# Altium PCB PCB1.PcbDoc
Units mm, origin at the board's own origin, x right, y up, seen from the top; angles counter-clockwise.
Board outline 164.72 x 160.53 mm, 2 copper layers (Top Layer, Bottom Layer); 88 components, 81 nets, 254 pads, 0 vias.
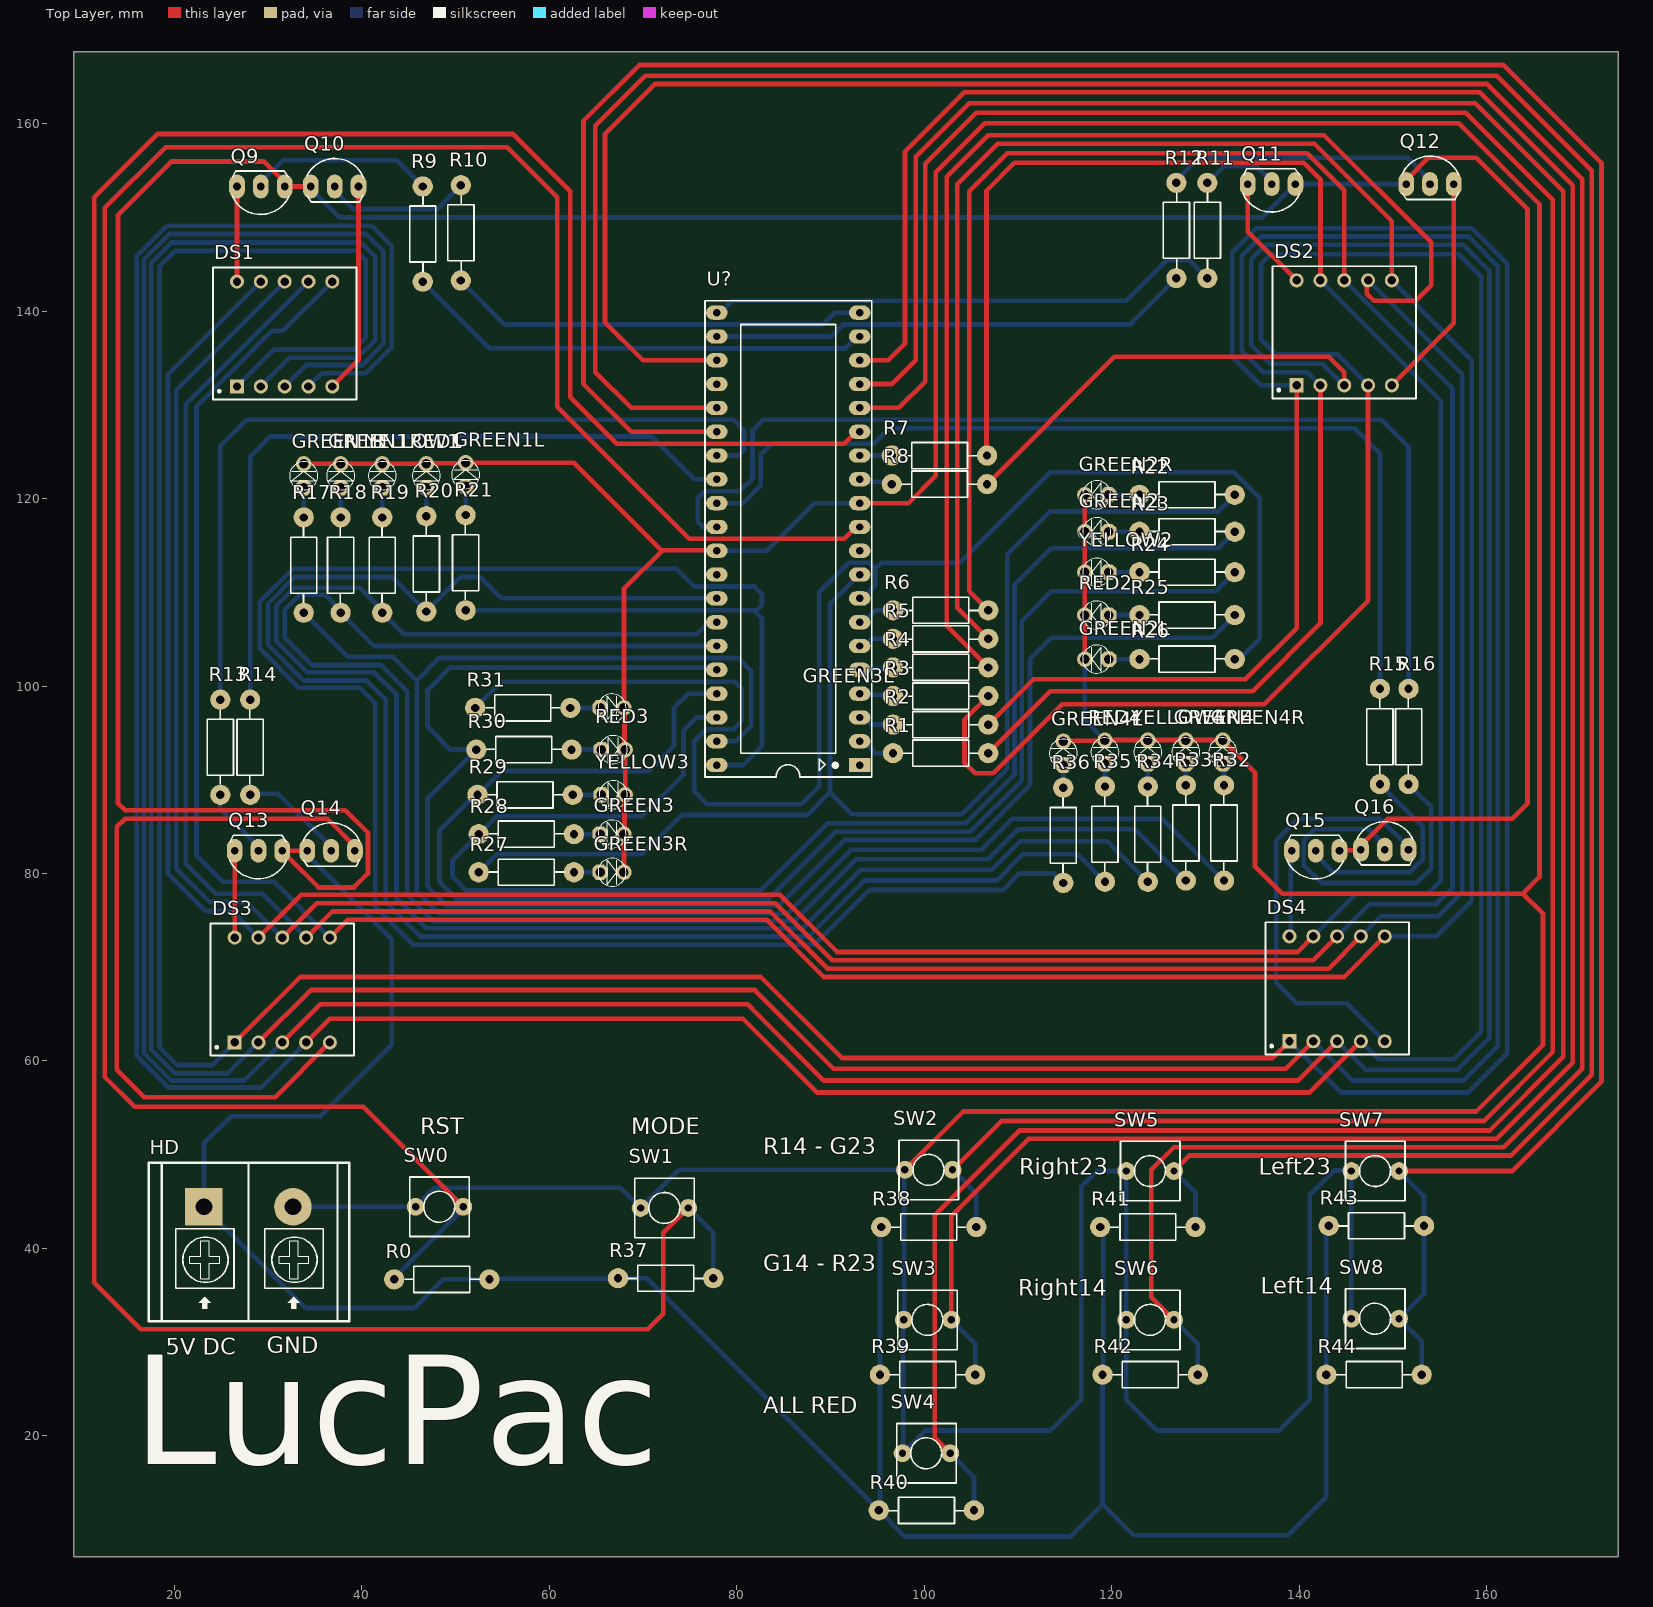
[diagram p0: Top Layer view]
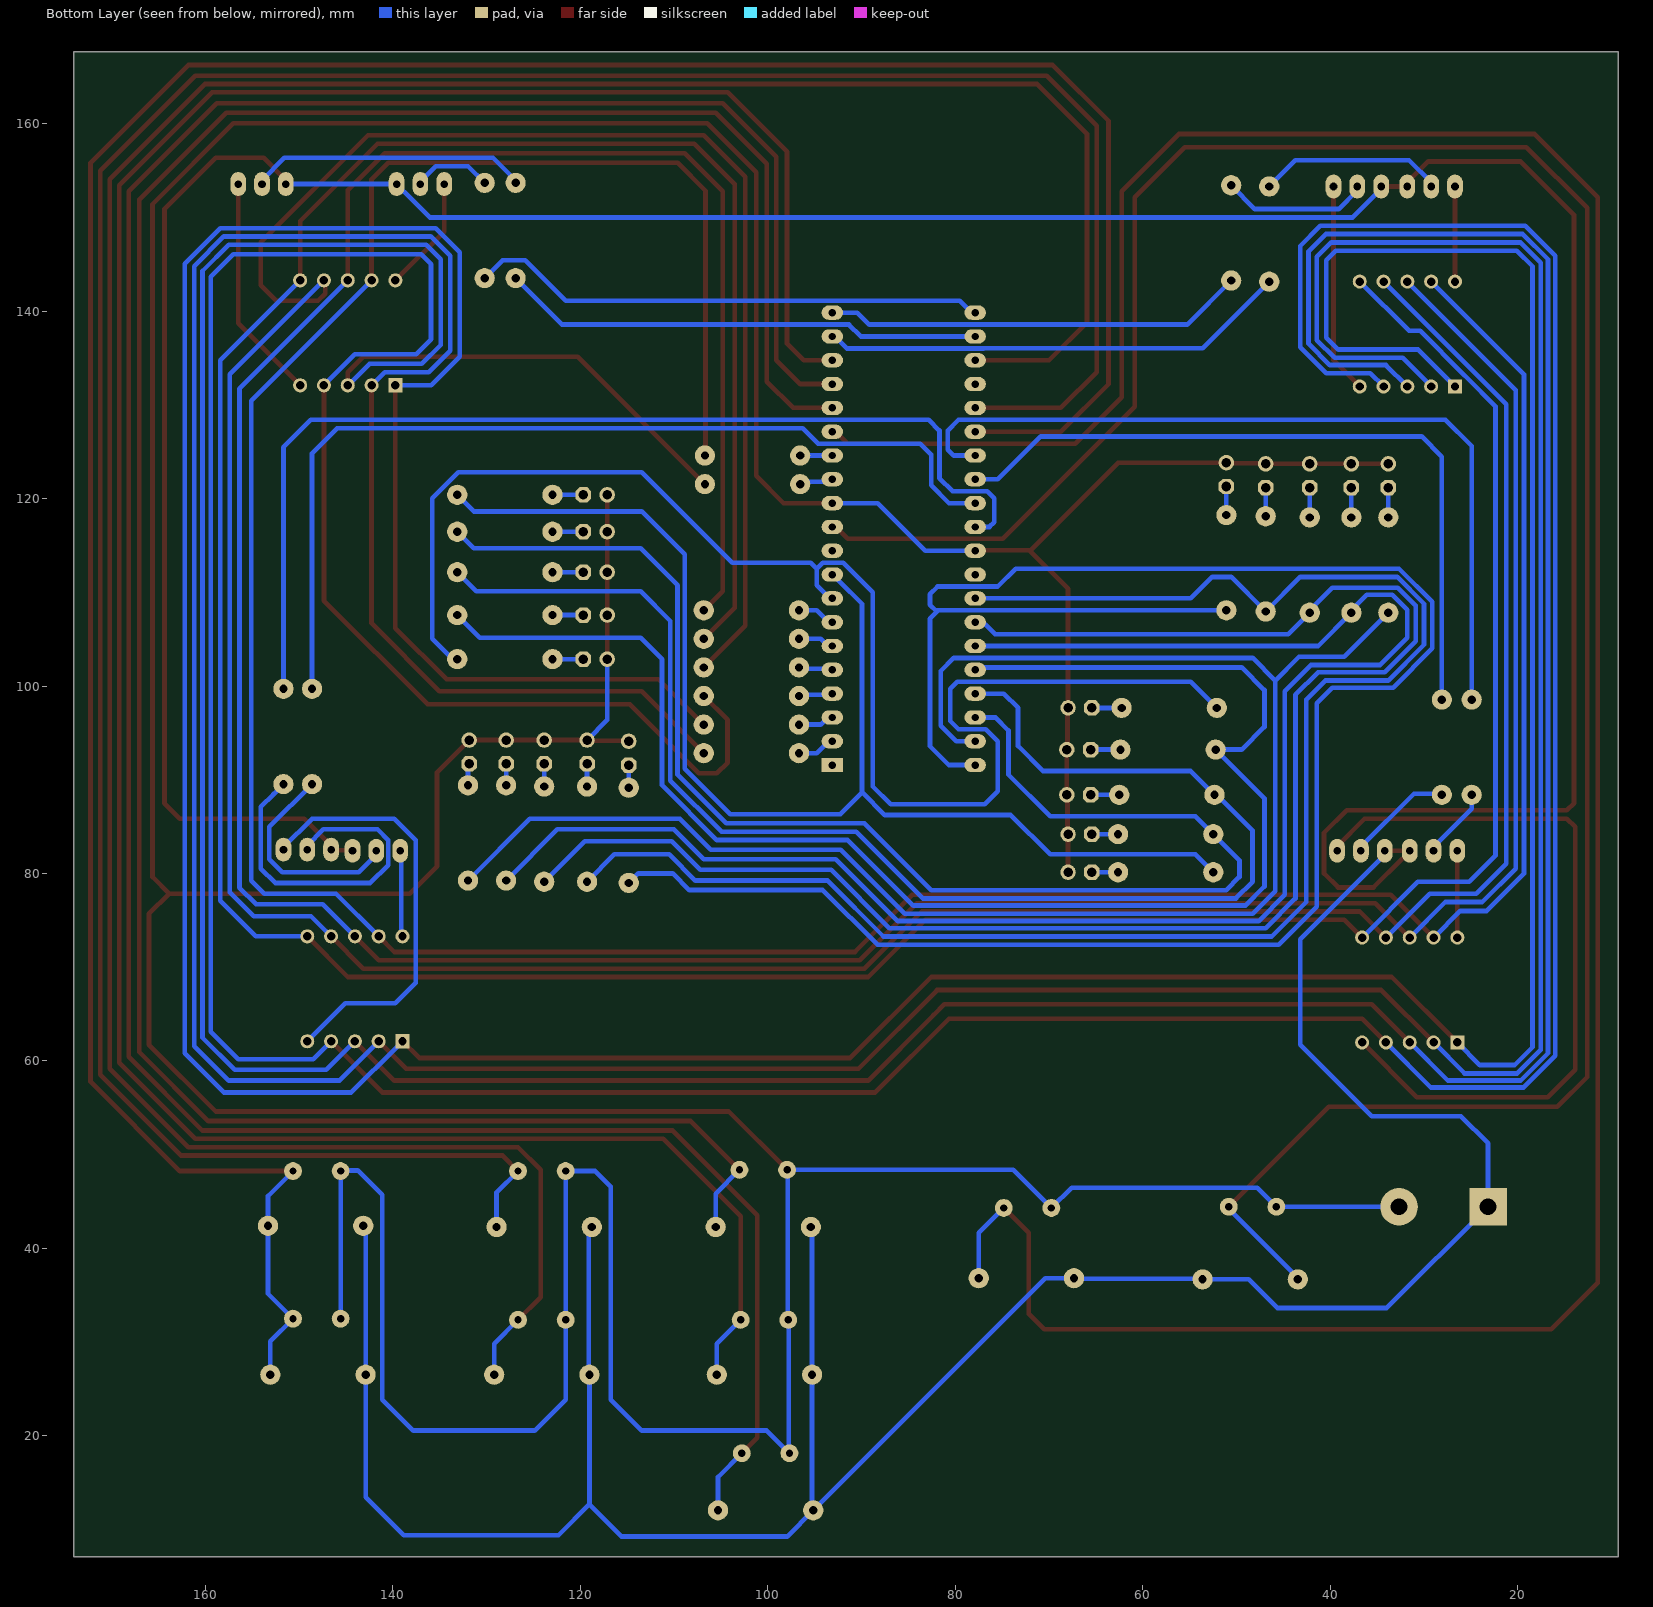
[diagram p1: Bottom Layer view, seen from below]

## Layer stack, top to bottom
Top Solder: solder mask 0.0102, Solder Resist, Dk 3.5
Top Layer: signal copper 0.0356
Dielectric 1: dielectric 0.32, FR-4, Dk 4.8
Bottom Layer: signal copper 0.0356
Bottom Solder: solder mask 0.0102, Solder Resist, Dk 3.5

## Board outline
9.271,7.112 173.99,7.112 173.99,167.64 9.271,167.64

## Design rules (kind name [scope] priority, off if disabled: settings)
Clearance [All] p1: gap=0.1 ignorepadtopadclearanceinfootprint=TRUE
HoleSize [All] p1: absolutevalues=TRUE maxlimit=2.5 minlimit=0.025 maxpercent=80.000 minpercent=20.000
MinimumSolderMaskSliver [All] p1: minsoldermaskwidth=0
PolygonConnect [All] p1: connectstyle=Relief reliefconductorwidth=0.254 reliefentries=4 polygonreliefangle="90 Angle" airgapwidth=0.254
RoutingVias [All] p1: holewidth=0.711 width=1.27 viastyle="Through Hole" minholewidth=0.711 minwidth=1.27 maxholewidth=0.711 maxwidth=1.27
SilkToSilkClearance [All] p1: silktosilkclearance=0
SilkToSolderMaskClearance [IsText] p1: minsilkscreentomaskgap=0 clearancetoexposedcopper=TRUE
SolderMaskExpansion [All] p1: expansion=0.102 istentingtop=FALSE
Width [All] p1: maxlimit=3.81 minlimit=0.203 preferedwidth=0.254
26 further rules are at their usual default settings.

## Components (designator, comment, footprint, x,y, rotation, side; value= is the part's Value field where it differs from the comment)
DS1 "LED7SEG-2" LED7SEG-2-0.36 31.75,137.795 r0 top
DS2 "LED7SEG-2" LED7SEG-2-0.36 144.78,137.922 r0 top
DS3 "LED7SEG-2" LED7SEG-2-0.36 31.496,67.818 r0 top
DS4 "LED7SEG-2" LED7SEG-2-0.36 144.018,67.945 r0 top
GREEN1 "LED" LED-3MM-GREEN 37.719,121.156 r90 top value="LED 3 ly Single Colour"
GREEN1L "LED" LED-3MM-GREEN 51.054,121.283 r90 top value="LED 3 ly Single Colour"
GREEN1R "LED" LED-3MM-GREEN 33.782,121.156 r90 top value="LED 3 ly Single Colour"
GREEN2 "LED" LED-3MM-GREEN 119.645,116.459 r180 top value="LED 3 ly Single Colour"
GREEN2L "LED" LED-3MM-GREEN 119.645,102.87 r180 top value="LED 3 ly Single Colour"
GREEN2R "LED" LED-3MM-GREEN 119.645,120.396 r180 top value="LED 3 ly Single Colour"
GREEN3 "LED" LED-3MM-GREEN 65.405,84.201 r0 top value="LED 3 ly Single Colour"
GREEN3L "LED" LED-3MM-GREEN 65.405,97.663 r0 top value="LED 3 ly Single Colour"
GREEN3R "LED" LED-3MM-GREEN 65.405,80.137 r0 top value="LED 3 ly Single Colour"
GREEN4 "LED" LED-3MM-GREEN 127.889,91.694 r90 top value="LED 3 ly Single Colour"
GREEN4L "LED" LED-3MM-GREEN 114.808,91.567 r90 top value="LED 3 ly Single Colour"
GREEN4R "LED" LED-3MM-GREEN 131.826,91.694 r90 top value="LED 3 ly Single Colour"
HD "HB9500-2P" HB9500-2P 23.139,44.45 r0 top
Q9 "2N3906" TO92-123 29.21,153.289 r180 top value=A1015
Q10 "2N3906" TO92-123 37.084,153.289 r0 top value=A1015
Q11 "2N3906" TO92-123 137.033,153.543 r180 top value=A1015
Q12 "2N3906" TO92-123 153.924,153.543 r0 top value=A1015
Q13 "2N3906" TO92-123 28.956,82.423 r180 top value=A1015
Q14 "2N3906" TO92-123 36.703,82.423 r0 top value=A1015
Q15 "2N3906" TO92-123 141.732,82.423 r180 top value=A1015
Q16 "2N3906" TO92-123 149.098,82.55 r0 top value=A1015
R0 "10K" R1/2W 53.594,36.703 r180 top value="R1/4W - 1K"
R1 "220" R1/2W 96.647,92.837 r0 top value="R1/4W - 1K"
R2 "220" R1/2W 96.647,95.885 r0 top value="R1/4W - 1K"
R3 "220" R1/2W 96.647,98.933 r0 top value="R1/4W - 1K"
R4 "220" R1/2W 96.647,101.981 r0 top value="R1/4W - 1K"
R5 "220" R1/2W 96.647,105.029 r0 top value="R1/4W - 1K"
R6 "220" R1/2W 96.647,108.077 r0 top value="R1/4W - 1K"
R7 "220" R1/2W 96.52,124.587 r0 top value="R1/4W - 1K"
R8 "220" R1/2W 96.52,121.539 r0 top value="R1/4W - 1K"
R9 "10k" R1/2W 46.482,143.129 r90 top value="R1/4W - 1K"
R10 "10k" R1/2W 50.546,143.256 r90 top value="R1/4W - 1K"
R11 "10k" R1/2W 130.175,143.51 r90 top value="R1/4W - 1K"
R12 "10k" R1/2W 126.873,143.51 r90 top value="R1/4W - 1K"
R13 "10k" R1/2W 24.892,98.552 r270 top value="R1/4W - 1K"
R14 "10k" R1/2W 28.067,98.552 r270 top value="R1/4W - 1K"
R15 "10k" R1/2W 148.59,99.695 r270 top value="R1/4W - 1K"
R16 "10k" R1/2W 151.638,99.695 r270 top value="R1/4W - 1K"
R17 "330" R1/2W 33.782,117.983 r270 top value="R1/4W - 1K"
R18 "330" R1/2W 37.719,117.983 r270 top value="R1/4W - 1K"
R19 "330" R1/2W 42.164,117.983 r270 top value="R1/4W - 1K"
R20 "330" R1/2W 46.863,118.11 r270 top value="R1/4W - 1K"
R21 "330" R1/2W 51.054,118.237 r270 top value="R1/4W - 1K"
R22 "330" R1/2W 133.096,120.396 r180 top value="R1/4W - 1K"
R23 "330" R1/2W 133.096,116.459 r180 top value="R1/4W - 1K"
R24 "330" R1/2W 133.096,112.141 r180 top value="R1/4W - 1K"
R25 "330" R1/2W 133.096,107.569 r180 top value="R1/4W - 1K"
R26 "330" R1/2W 133.096,102.87 r180 top value="R1/4W - 1K"
R27 "330" R1/2W 62.611,80.137 r180 top value="R1/4W - 1K"
R28 "330" R1/2W 62.611,84.201 r180 top value="R1/4W - 1K"
R29 "330" R1/2W 62.484,88.392 r180 top value="R1/4W - 1K"
R30 "330" R1/2W 62.357,93.218 r180 top value="R1/4W - 1K"
R31 "330" R1/2W 62.23,97.663 r180 top value="R1/4W - 1K"
R32 "330" R1/2W 131.953,89.408 r270 top value="R1/4W - 1K"
R33 "330" R1/2W 127.889,89.408 r270 top value="R1/4W - 1K"
R34 "330" R1/2W 123.825,89.281 r270 top value="R1/4W - 1K"
R35 "330" R1/2W 119.253,89.281 r270 top value="R1/4W - 1K"
R36 "330" R1/2W 114.808,89.154 r270 top value="R1/4W - 1K"
R37 "10k" R1/2W 67.31,36.83 r0 top value="R1/4W - 1K"
R38 "10k" R1/2W 95.377,42.291 r0 top value="R1/4W - 1K"
R39 "10k" R1/2W 95.25,26.543 r0 top value="R1/4W - 1K"
R40 "10k" R1/2W 95.123,12.065 r0 top value="R1/4W - 1K"
R41 "10k" R1/2W 118.745,42.291 r0 top value="R1/4W - 1K"
R42 "10k" R1/2W 118.999,26.543 r0 top value="R1/4W - 1K"
R43 "10k" R1/2W 143.129,42.418 r0 top value="R1/4W - 1K"
R44 "10k" R1/2W 142.875,26.543 r0 top value="R1/4W - 1K"
RED1 "LED" LED-3MM-RED 46.863,121.156 r90 top value="LED 3 ly Single Colour"
RED2 "LED" LED-3MM-RED 119.634,107.569 r180 top value="LED 3 ly Single Colour"
RED3 "LED" LED-3MM-RED 65.532,93.218 r0 top value="LED 3 ly Single Colour"
RED4 "LED" LED-3MM-RED 119.253,91.694 r90 top value="LED 3 ly Single Colour"
SW0 "SW" SW2 45.72,44.45 r0 top value="SW chip 2 pin"
SW1 "SW" SW2 69.723,44.323 r0 top value="SW chip 2 pin"
SW2 "SW" SW2 97.917,48.387 r0 top value="SW chip 2 pin"
SW3 "SW" SW2 97.79,32.385 r0 top value="SW chip 2 pin"
SW4 "SW" SW2 97.663,18.161 r0 top value="SW chip 2 pin"
SW5 "SW" SW2 121.539,48.26 r0 top value="SW chip 2 pin"
SW6 "SW" SW2 121.539,32.385 r0 top value="SW chip 2 pin"
SW7 "SW" SW2 145.542,48.26 r0 top value="SW chip 2 pin"
SW8 "SW" SW2 145.542,32.512 r0 top value="SW chip 2 pin"
U? "PIC16F887-PU" DIP40/W0.6 93.091,91.567 r90 top
YELLOW1 "LED" LED-3MM-YELLOW 42.164,121.156 r90 top value="LED 3 ly Single Colour"
YELLOW2 "LED" LED-3MM-YELLOW 119.645,112.141 r180 top value="LED 3 ly Single Colour"
YELLOW3 "LED" LED-3MM-YELLOW 65.532,88.392 r0 top value="LED 3 ly Single Colour"
YELLOW4 "LED" LED-3MM-YELLOW 123.825,91.694 r90 top value="LED 3 ly Single Colour"

## Footprints (in the part's own frame and the unit in brackets; to place one, negate y for a bottom-side part, rotate by r counter-clockwise, add the part's x,y. Pads: shape width x height; smd on the part's side, far side on the other; paste and mask are expansions set on the pad)
DIP40/W0.6 [mil] "40 PIN, W 600mil, Pin to pin 100mil"
  rect 60x90 hole 31: 1(0,0)
  oval 60x90 hole 31: 2(100,0) 3(200,0) 4(300,0) 5(400,0) 6(500,0) 7(600,0) 8(700,0) 9(800,0) 10(900,0) 11(1000,0) 12(1100,0) 13(1200,0) 14(1300,0) 15(1400,0) 16(1500,0) 17(1600,0) 18(1700,0) 19(1800,0) 20(1900,0) 21(1900,600) 22(1800,600) 23(1700,600) 24(1600,600) 25(1500,600) 26(1400,600) 27(1300,600) 28(1200,600) 29(1100,600) 30(1000,600) 31(900,600) 32(800,600) 33(700,600) 34(600,600) 35(500,600) 36(400,600) 37(300,600) 38(200,600) 39(100,600) 40(0,600)
  silkscreen extent -50,-50 1950,650, body extent -82,-10 1982,600, height 224
HB9500-2P [mm]
  rect 4x4 hole 1.8: 1(0,0)
  round 4 hole 1.8: 2(9.5,0)
  silkscreen extent -5.9,-12.2 15.49,4.7, body extent -5.72,-12 15.32,4.5, height 18.51
LED7SEG-2-0.36 [mm] "LED, 7-Segment Display, 9.2 mm, Dual Digit; 10 Leads; Row Space 10.7 mm; Pitch 2.54 mm"
  rect 1.5x1.5 hole 0.9: 1(-5.08,-5.842)
  round 1.5 hole 0.9: 2(-2.54,-5.842) 3(0,-5.842) 4(2.54,-5.842) 5(5.08,-5.842) 6(5.08,5.35) 7(2.54,5.35) 8(0,5.35) 9(-2.54,5.35) 10(-5.08,5.35)
  silkscreen extent -7.65,-7.24 7.65,6.86, body extent -7.5,-7.26 7.5,6.75, height 12.02
LED-3MM-GREEN [mil]
  oct 65x65 hole 40: 1(0,0)
  round 65 hole 40: 2(100,0)
  silkscreen extent -9,-59 109,59, body extent -15,-70 112,60, height 182
LED-3MM-RED [mil]
  oct 65x65 hole 40: 1(0,0)
  round 65 hole 40: 2(100,0)
  silkscreen extent -9,-59 109,59, body extent -27,-77 117,80, height 181
LED-3MM-YELLOW [mil]
  oct 65x65 hole 40: 1(0,0)
  round 65 hole 40: 2(100,0)
  silkscreen extent -9,-59 109,59, body extent -27,-77 117,80, height 181
R1/2W [mil] "R 1/2W, 2 pin, 300mil"
  round 85 hole 35: 1(0,0) 2(400,0)
  silkscreen extent 42,-55 356,55, body extent -12,-45 414,49, height 91
SW2 [mil] "SW button 2pin, 250x 250 mil"
  round 75 hole 31: 1(0,0) 2(200,0)
  silkscreen extent -25,-125 225,125, body extent -60,-163 255,157, height 257
TO92-123 [mil] "TO-92"
  oval 66x100 hole 32: 1(-100,0) 2(0,0) 3(100,0)
  silkscreen extent -117,-65 120,118, body extent -109,-66 109,95, height 245

## Part data
DS1 DS2 DS3 DS4: "9.2 mm Green 7-Segment Display: 2-Digit, RH DP", ComponentLink1Description="Manufacturer Link", ComponentLink1URL=http://www.avagotech.com/, DatasheetVersion=14-Mar-2003, LatestRevisionDate=11-Oct-2004, LatestRevisionNote="Display outline superimposed on PCB Footprint.", PackageDescription="LED, 7-Segment Display, 9.2 mm, Dual Digit; 10 Leads; Row Space 10.7 mm; Pitch 2.54 mm", PackageReference=HDSM-577, PackageVersion=14-Mar-2003, Published=26-May-2004, Publisher="Altium Limited"
GREEN1 GREEN1L GREEN1R GREEN2 GREEN2L GREEN2R GREEN3 GREEN3L GREEN3R GREEN4 GREEN4L GREEN4R RED1 RED2 RED3 RED4 YELLOW1 YELLOW2 YELLOW3 YELLOW4: "LED Single colour Green and Red"
HD: "Terminal Block, Header, 2P, 15A, 300VAC Rohs Compliant: Yes"
Q9 Q10 Q11 Q12 Q13 Q14 Q15 Q16: "PNP 600mW, ECB"
R0 R1 R2 R3 R4 R5 R6 R7 R8 R9 R10 R11 R12 R13 R14 R15 R16 R17 R18 R19 R20 R21 R22 R23 R24 R25 R26 R27 R28 R29 R30 R31 R32 R33 R34 R35 R36 R37 R38 R39 R40 R41 R42 R43 R44: library part R1/4W, "Resistor 1/4W"
SW0 SW1 SW2 SW3 SW4 SW5 SW6 SW7 SW8: library part SW2, "Switch button 2 pin"
U?: "Flash-Based, 8-Bit CMOS Microcontroller with nanoWatt Technology, 8K (x14-Bit words) Program Memory, 624 Bytes Data Memory, 35 I/O pins, 40-Pin PDIP, Standard VDD Range, Extended Temperature", Supplier Part Number 1=PIC16F887-E/P-ND, ComponentLink1Description=Datasheet, ComponentLink1URL=http://ww1.microchip.com/downloads/en/DeviceDoc/41291F.pdf, ComponentLink2Description="Packaging Specification", ComponentLink2URL=http://www.microchip.com/stellent/groups/techpub_sg/documents/packagingspec/en012702.pdf, ComponentLink3Description="Microchip.com Home", ComponentLink3URL=http://www.microchip.com/, DatasheetVersion="revF, Apr-2009", LatestRevisionDate=02-Dec-2009, LatestRevisionNote="Updated datasheet to version revF, Apr-2009.", PackageDescription="40-Lead Plastic Dual In-Line (P) - 600 mil Body [PDIP]", PackageReference=PDIP600-P40, PackageVersion="revBB, Aug-2009", Published=29-Jan-2009, Publisher="Altium Limited", Supplier 1=Digi-Key, Supplier 2=Farnell, Supplier Part Number 2=1703423

## Nets (pads, with @x,y where several pads share a name; then routed paths per layer and width w, separated by ;. In a path a pad name is that pad's centre, name@x,y a point inside that pad or via, vN(x,y) a via of type N, cw(c..) or ccw(c..) an arc to the next point about the centre after c; other vN are vias at no path point)
NetDS1_1: DS1.1 DS2.1 DS3.1 DS4.1 R2.2 | length 485.8
  Top Layer w0.5: DS3.1 33.401,68.961 82.55,68.961 91.186,60.325 137.16,60.325 DS4.1 ; R2.2 111.633,100.711 134.239,100.711 139.7,106.172 DS2.1
  Bottom Layer w0.5: DS3.1 24.003,59.563 20.32,59.563 18.399,61.484 18.399,144.764 20.066,146.431 39.37,146.431 40.386,145.415 40.386,137.16 39.116,135.89 30.607,135.89 DS1.1 ; DS4.1 139.561,61.48 144.399,56.642 157.988,56.642 162.179,60.833 162.179,145.034 158.369,148.844 135.415,148.844 132.842,146.271 132.842,135.128 135.89,132.08 DS2.1
NetDS1_2: DS1.2 DS2.2 DS3.2 DS4.2 R1.2 | length 488.1
  Top Layer w0.5: DS3.2 34.544,67.564 81.915,67.564 90.297,59.182 138.557,59.182 DS4.2 ; R1.2 113.411,99.441 135.001,99.441 142.24,106.68 DS2.2
  Bottom Layer w0.5: DS3.2 25.654,58.674 20.016,58.674 17.51,61.18 17.51,145.145 19.685,147.32 39.878,147.32 41.402,145.796 41.402,136.906 39.497,135.001 32.258,135.001 DS1.2 ; DS4.2 145.669,57.912 157.48,57.912 161.163,61.595 161.163,144.78 157.988,147.955 135.923,147.955 133.858,145.89 133.858,135.763 136.144,133.477 140.843,133.477 DS2.2
NetDS1_3: DS1.3 DS2.3 DS3.3 DS4.3 R8.2 | length 465.9
  Top Layer w0.5: DS3.3 35.56,66.04 81.153,66.04 82.296,64.897 89.281,57.912 139.827,57.912 DS4.3 ; R8.2 120.269,135.128 143.129,135.128 144.78,133.477 DS2.3
  Bottom Layer w0.5: DS3.3 27.44,57.92 19.677,57.92 16.748,60.849 16.748,145.526 19.431,148.209 40.436,148.209 42.291,146.354 42.291,136.525 40.005,134.239 34.036,134.239 DS1.3 ; DS4.3 147.066,59.055 156.845,59.055 160.274,62.484 160.274,144.272 157.48,147.066 136.431,147.066 134.874,145.509 134.874,136.376 136.884,134.366 142.45,134.366 144.736,132.08 DS2.3
NetDS1_4: DS1.4 DS2.4 DS3.4 DS4.4 R3.2 | length 500.8
  Top Layer w0.5: DS3.4 36.576,64.516 80.645,64.516 88.519,56.642 141.097,56.642 DS4.4 ; R3.2 104.267,96.393 104.267,91.821 105.41,90.678 107.315,90.678 114.681,98.044 136.271,98.044 147.32,109.093 DS2.4
  Bottom Layer w0.5: DS3.4 29.226,57.166 19.365,57.166 15.986,60.545 15.986,145.907 19.177,149.098 41.021,149.098 43.18,146.939 43.18,136.144 40.394,133.358 35.695,133.358 DS1.4 ; DS4.4 148.463,60.198 156.464,60.198 159.385,63.119 159.385,143.637 156.972,146.05 136.939,146.05 135.89,145.001 135.89,136.989 137.497,135.382 144.018,135.382 DS2.4
NetDS1_5: DS1.5 Q10.3 | length 22.5
  Top Layer w0.5: DS1.5 39.624,134.747 Q10.3
NetDS1_6: DS1.6 DS2.6 DS3.6 DS4.6 R5.2 | length 391.7
  Top Layer w0.5: DS3.6 38.465,75.057 83.185,75.057 89.281,68.961 144.764,68.961 DS4.6 ; R5.2 103.505,108.331 103.505,153.543 107.823,157.861 141.605,157.861 149.86,149.606 DS2.6
  Bottom Layer w0.5: DS3.6 30.623,79.121 25.146,79.121 22.352,81.915 22.352,129.848 25.416,132.912 25.711,133.207 30.388,137.884 31.569,137.884 DS1.6 ; DS4.6 154.575,73.295 158.369,77.089 158.369,134.763 DS2.6
NetDS1_7: DS1.7 DS2.7 DS3.7 DS4.7 R4.2 | length 409.8
  Top Layer w0.5: DS3.7 36.814,75.946 83.566,75.946 89.662,69.85 143.113,69.85 DS4.7 ; R4.2 102.362,106.426 102.362,154.305 106.807,158.75 142.621,158.75 154.051,147.32 154.051,142.748 152.4,141.097 147.955,141.097 147.193,141.859 147.193,143.145 DS2.7
  Bottom Layer w0.5: DS3.7 29.353,77.851 24.384,77.851 21.209,81.026 21.209,130.064 DS1.7 ; DS4.7 147.768,74.505 148.701,75.438 154.813,75.438 157.353,77.978 157.353,133.239 DS2.7
NetDS1_8: DS1.8 DS2.8 DS3.8 DS4.8 R6.2 | length 381.9
  Top Layer w0.5: DS3.8 35.163,76.835 84.074,76.835 90.17,70.739 141.462,70.739 DS4.8 ; R6.2 104.775,110.109 104.775,152.781 108.839,156.845 140.843,156.845 144.78,152.908 DS2.8
  Bottom Layer w0.5: DS3.8 27.702,76.962 23.749,76.962 20.193,80.518 20.193,131.572 31.75,143.129 DS1.8 ; DS4.8 147.431,76.708 154.559,76.708 156.337,78.486 156.337,131.715 DS2.8
NetDS1_9: DS1.9 DS2.9 DS3.9 DS4.9 R7.2 | length 359.4
  Top Layer w0.5: DS3.9 33.512,77.724 84.582,77.724 90.678,71.628 139.811,71.628 DS4.9 ; R7.2 106.617,124.65 106.617,152.844 109.601,155.829 140.462,155.829 142.24,154.051 DS2.9
  Bottom Layer w0.5: DS3.9 26.114,76.01 23.304,76.01 19.304,80.01 19.304,133.223 29.21,143.129 DS1.9 ; DS4.9 146.034,77.851 153.67,77.851 155.067,79.248 155.067,130.445 DS2.9
NetDS1_10: DS1.10 Q9.3 | length 10.3
  Top Layer w0.254: Q9.3@26.607,153.225 Q9.3 ; DS1.10 DS1.10@26.733,143.208
  Top Layer w0.5: DS1.10 Q9.3
NetDS2_5: DS2.5 Q12.3 | length 24.2
  Top Layer w0.5: DS2.5 156.464,138.684 Q12.3
NetDS2_10: DS2.10 Q11.3 | length 12.4
  Top Layer w0.5: Q11.3 134.493,148.479 DS2.10
NetDS3_5: DS3.5 Q14.3 | length 79.8
  Top Layer w0.254: Q14.3 Q14.3@39.243,82.931
  Top Layer w0.5: DS3.5 30.734,56.134 16.764,56.134 13.843,59.055 13.843,84.963 14.732,85.852 36.322,85.852 Q14.3@39.243,82.931
  Bottom Layer w0.5: DS3.5@36.83,61.833 DS3.5@36.838,61.841
NetDS3_10: DS3.10 Q13.3 | length 9.3
  Top Layer w0.5: DS3.10 Q13.3
NetDS4_5: DS4.5 Q16.3 | length 45.9
  Bottom Layer w0.5: DS4.5 145.034,66.167 139.7,66.167 137.541,68.326 137.541,83.566 139.827,85.852 148.59,85.852 151.638,82.804 Q16.3
NetDS4_10: DS4.10 Q15.3 | length 10
  Top Layer w0.5: DS4.10 DS4.10@139.065,73.422 ; Q15.3@139.065,82.296 Q15.3 Q15.3@139.192,82.855
  Bottom Layer w0.5: DS4.10 139.065,73.422 139.065,82.296 Q15.3
NetGREEN1_1: GREEN1.1 R18.1 | length 3.2
  Bottom Layer w0.5: R18.1 GREEN1.1
NetGREEN1_2: GREEN1.2 GREEN1L.2 GREEN1R.2 GREEN2.2 GREEN2L.2 GREEN2R.2 GREEN3.2 GREEN3L.2 GREEN3R.2 GREEN4.2 GREEN4L.2 GREEN4R.2 HD.2 RED1.2 RED2.2 RED3.2 RED4.2 SW0.1 SW1.1 SW2.1 SW3.1 SW4.1 SW5.1 SW6.1 SW7.1 SW8.1 U?.12 U?.31 YELLOW1.2 YELLOW2.2 YELLOW3.2 YELLOW4.2 | length 705.6
  Top Layer w0.5: GREEN1R.2 GREEN1.2 YELLOW1.2 RED1.2 46.926,123.76 50.99,123.76 GREEN1L.2 62.613,123.823 71.945,114.49 77.787,114.49 U?.31 ; GREEN3R.2 GREEN3.2 68.008,84.264 68.008,88.328 YELLOW3.2 RED3.2 68.008,93.281 68.008,97.599 GREEN3L.2 67.945,110.363 72.009,114.427 ; U?.12 98.298,119.507 101.219,122.428 101.219,154.813 106.426,160.02 156.972,160.02 165.608,151.384 165.608,79.629 163.83,77.851 ; SW2.1 104.14,54.61 158.877,54.61 165.989,61.722 165.989,75.692 163.83,77.851 ; GREEN4L.2 114.871,94.17 119.189,94.17 RED4.2 YELLOW4.2 GREEN4.2 GREEN4R.2 135.255,90.805 135.255,80.772 138.176,77.851 163.83,77.851 ; GREEN2L.2 117.1,102.876 117.1,107.563 RED2.2 117.1,107.575 117.1,112.135 YELLOW2.2 GREEN2.2 GREEN2R.2
  Bottom Layer w0.5: HD.2 SW0.1 47.752,46.482 67.564,46.482 SW1.1 73.787,48.387 SW2.1 97.853,48.323 97.853,32.448 SW3.1 97.727,32.322 SW4.1@97.727,18.224 ; U?.31 83.185,114.427 88.265,119.507 U?.12 ; SW4.1 SW4.1@97.727,18.224 ; GREEN4L.2 GREEN4L.2@114.871,94.17 ; GREEN2L.2 117.105,96.382 RED4.2 RED4.2@119.189,94.17 ; SW8.1 SW7.1 145.478,48.323 143.701,48.323 141.097,45.72 141.097,23.876 137.795,20.574 124.841,20.574 121.539,23.876 SW6.1 SW5.1 118.364,48.26 116.713,46.609 116.713,23.876 113.411,20.574 100.076,20.574 SW4.1@97.727,18.224
NetGREEN1L_1: GREEN1L.1 R21.1 | length 3
  Bottom Layer w0.5: R21.1 GREEN1L.1
NetGREEN1R_1: GREEN1R.1 R17.1 | length 3.2
  Bottom Layer w0.5: R17.1 GREEN1R.1
NetGREEN2_1: GREEN2.1 R23.2 | length 3.3
  Bottom Layer w0.5: GREEN2.1 R23.2
NetGREEN2L_1: GREEN2L.1 R26.2 | length 3.3
  Bottom Layer w0.5: GREEN2L.1 R26.2
NetGREEN2R_1: GREEN2R.1 R22.2 | length 3.3
  Bottom Layer w0.5: GREEN2R.1 R22.2
NetGREEN3_1: GREEN3.1 R28.1 | length 2.8
  Bottom Layer w0.5: R28.1 GREEN3.1
NetGREEN3L_1: GREEN3L.1 R31.1 | length 3.2
  Bottom Layer w0.5: R31.1 GREEN3L.1
NetGREEN3R_1: GREEN3R.1 R27.1 | length 2.8
  Bottom Layer w0.5: R27.1 GREEN3R.1
NetGREEN4_1: GREEN4.1 R33.1 | length 2.3
  Bottom Layer w0.5: R33.1 GREEN4.1
NetGREEN4L_1: GREEN4L.1 R36.1 | length 2.4
  Bottom Layer w0.5: R36.1 GREEN4L.1
NetGREEN4R_1: GREEN4R.1 R32.1 | length 2.3
  Bottom Layer w0.5: GREEN4R.1 131.953,91.567 R32.1
NetHD_1: HD.1 Q9.1 Q10.1 Q11.1 Q12.1 Q13.1 Q14.1 Q15.1 Q16.1 R0.1 R37.1 R38.1 R39.1 R40.1 R41.1 R42.1 R43.1 R44.1 | length 642.4
  Top Layer w0.254: Q13.1 31.496,82.376 32.297,81.576 ; Q9.1 Q9.1@31.75,153.721
  Top Layer w0.5: Q13.1 Q14.1 ; Q9.1 Q10.1 ; Q9.1@31.75,153.721 29.515,155.956 19.685,155.956 13.97,150.241 13.97,87.503 14.732,86.741 38.227,86.741 40.64,84.328 40.64,80.01 39.139,78.509 35.363,78.509 32.297,81.576 ; Q15.1 144.335,82.486 146.494,82.486 Q16.1 146.558,82.982 149.428,85.852 162.687,85.852 164.338,87.503 164.338,150.876 158.877,156.337 153.746,156.337 151.384,153.975 Q12.1
  Bottom Layer w0.5: Q13.1@31.496,82.376 Q13.1 ; Q9.1@31.75,152.857 Q9.1 ; Q14.1 34.163,81.991 43.18,72.974 43.18,61.722 35.56,54.102 26.035,54.102 23.139,51.206 HD.1 33.934,33.655 45.636,33.655 48.684,36.703 R0.1 53.657,36.767 67.246,36.767 R37.1 70.358,36.83 R40.1 ; Q10.1 34.544,153.035 37.592,149.987 136.017,149.987 138.749,152.719 138.796,152.719 139.573,153.496 Q11.1 Q12.1 ; R38.1 95.25,42.164 R39.1 95.25,12.192 R40.1 ; R41.1 119.062,41.974 119.062,26.607 R42.1 118.999,12.7 ; R43.1 142.875,42.164 R44.1 142.875,13.462 138.811,9.398 122.301,9.398 118.999,12.7 ; Q15.1@144.272,82.376 Q15.1 ; R40.1 97.917,9.271 115.57,9.271 118.999,12.7
NetQ9_2: Q9.2 R9.2 | length 19.8
  Bottom Layer w0.5: Q9.2 29.21,153.721 31.572,156.083 43.688,156.083 R9.2
NetQ10_2: Q10.2 R10.2 | length 15.8
  Bottom Layer w0.5: Q10.2 37.084,152.857 39.065,150.876 48.006,150.876 R10.2
NetQ11_2: Q11.2 R11.2 | length 8.5
  Bottom Layer w0.5: R11.2 131.953,155.448 135.382,155.448 137.033,153.797 Q11.2
NetQ12_2: Q12.2 R12.2 | length 29.7
  Bottom Layer w0.5: R12.2 126.873,153.924 129.286,156.337 151.562,156.337 153.924,153.975 Q12.2
NetQ13_2: Q13.2 R13.2 | length 7.7
  Bottom Layer w0.5: R13.2 24.892,86.919 28.956,82.855 Q13.2
NetQ14_2: Q14.2 R14.2 | length 11.5
  Bottom Layer w0.5: R14.2 28.194,88.519 31.039,88.519 36.703,82.855 Q14.2
NetQ15_2: Q15.2 R15.2 | length 23.1
  Bottom Layer w0.5: Q15.2 141.732,81.991 143.594,80.129 151.757,80.129 153.162,81.534 153.162,84.963 R15.2
NetQ16_2: Q16.2 R16.2 | length 37.9
  Bottom Layer w0.5: Q16.2 149.098,82.982 147.371,84.709 141.605,84.709 140.462,83.566 140.462,80.899 142.367,78.994 152.527,78.994 154.051,80.518 154.051,87.122 152.698,88.475 R16.2
NetR0_2: R0.2 SW0.2 U?.11 | length 261.6
  Top Layer w0.5: SW0.2 40.132,55.118 15.748,55.118 12.573,58.293 12.573,151.003 19.05,157.48 55.499,157.48 60.833,152.146 60.833,129.794 74.93,115.697 91.44,115.697 92.71,116.967 U?.11
  Bottom Layer w0.5: R0.2 43.434,36.893 50.8,44.259 SW0.2
NetR1_1: R1.1 U?.2 | length 4.1
  Bottom Layer w0.5: U?.2 93.472,94.107 94.742,92.837 R1.1
NetR2_1: R2.1 U?.3 | length 3.9
  Bottom Layer w0.5: U?.3 93.564,96.647 94.326,95.885 R2.1
NetR3_1: R3.1 U?.4 | length 3.7
  Bottom Layer w0.5: U?.4 93.218,99.06 96.52,99.06 R3.1
NetR4_1: R4.1 U?.5 | length 3.7
  Bottom Layer w0.5: U?.5 93.218,101.854 96.52,101.854 R4.1
NetR5_1: R5.1 U?.6 | length 3.9
  Bottom Layer w0.5: U?.6 93.564,104.267 94.326,105.029 R5.1
NetR6_1: R6.1 U?.7 | length 4.1
  Bottom Layer w0.5: U?.7 93.472,106.807 94.742,108.077 R6.1
NetR7_1: R7.1 U?.14 | length 3.4
  Bottom Layer w0.5: U?.14 R7.1
NetR8_1: R8.1 U?.13 | length 3.6
  Bottom Layer w0.5: U?.13 93.334,121.804 96.255,121.804 R8.1
NetR9_1: R9.1 U?.19 | length 50.1
  Bottom Layer w0.5: R9.1 53.594,136.017 76.95,136.017 76.954,136.013 91.563,136.013 92.837,137.287 U?.19
NetR10_1: R10.1 U?.20 | length 45
  Bottom Layer w0.5: R10.1 55.245,138.557 89.154,138.557 90.424,139.827 U?.20
NetR11_1: R11.1 U?.21 | length 55.4
  Bottom Layer w0.5: U?.21 78.232,139.827 79.502,141.097 121.517,141.097 125.835,145.415 128.27,145.415 R11.1
NetR12_1: R12.1 U?.22 | length 51.6
  Bottom Layer w0.5: U?.22 90.043,137.287 91.313,138.557 121.92,138.557 R12.1
NetR13_1: R13.1 U?.27 | length 89.8
  Bottom Layer w0.5: R13.1 24.892,125.603 27.686,128.397 79.629,128.397 80.772,127.254 80.772,125.222 80.137,124.587 U?.27
NetR14_1: R14.1 U?.28 | length 78.5
  Bottom Layer w0.5: R14.1 28.067,124.46 30.226,126.619 70.866,126.619 75.438,122.047 U?.28
NetR15_1: R15.1 U?.29 | length 102.2
  Bottom Layer w0.5: U?.29 80.645,119.507 82.55,121.412 82.55,124.692 83.715,125.857 94.615,125.857 96.266,127.508 145.923,127.508 148.59,124.841 R15.1
NetR16_1: R16.1 U?.30 | length 114
  Bottom Layer w0.5: U?.30 76.327,116.967 75.819,117.475 75.819,120.015 76.581,120.777 80.264,120.777 81.661,122.174 81.661,127.254 82.804,128.397 148.717,128.397 151.638,125.476 R16.1
NetR17_2: R17.2 R32.2 U?.39 | length 179.1
  Bottom Layer w0.5: R17.2 38.481,103.124 43.307,103.124 45.847,100.584 ; U?.39 79.883,94.107 81.534,95.758 81.534,101.6 80.137,102.997 48.26,102.997 45.847,100.584 ; R32.2 125.349,85.852 109.347,85.852 106.045,82.55 92.202,82.55 85.344,75.692 48.26,75.692 45.847,78.105 45.847,100.584
NetR18_2: R18.2 R33.2 U?.35 | length 179.8
  Bottom Layer w0.5: U?.35 41.275,104.267 R18.2 37.719,108.077 36.068,109.728 33.363,109.728 31.75,108.115 31.75,105.156 34.671,102.235 42.037,102.235 44.831,99.441 44.831,77.724 47.625,74.93 86.106,74.93 92.71,81.534 106.807,81.534 109.982,84.709 122.428,84.709 R33.2
NetR19_1: R19.1 YELLOW1.1 | length 3.2
  Bottom Layer w0.5: R19.1 YELLOW1.1
NetR19_2: R19.2 R34.2 U?.34 | length 178.3
  Bottom Layer w0.5: U?.34 77.608,106.564 76.761,106.564 75.734,105.537 44.45,105.537 R19.2 42.164,108.077 39.751,110.49 32.766,110.49 30.861,108.585 30.861,104.775 34.163,101.473 41.275,101.473 43.688,99.06 43.688,77.343 46.863,74.168 86.995,74.168 93.218,80.391 107.188,80.391 110.236,83.439 119.507,83.439 R34.2
NetR20_1: R20.1 RED1.1 | length 3
  Bottom Layer w0.5: R20.1 RED1.1
NetR20_2: R20.2 R35.2 U?.33 | length 177.1
  Bottom Layer w0.5: U?.33 54.864,109.347 52.578,111.633 50.546,111.633 R20.2 43.18,111.633 32.843,111.633 29.972,108.762 29.972,104.394 33.782,100.584 40.513,100.584 42.545,98.552 42.545,76.962 46.228,73.279 87.63,73.279 93.599,79.248 107.696,79.248 110.49,82.042 116.332,82.042 R35.2
NetR21_2: R21.2 R36.2 U?.40 | length 229.8
  Bottom Layer w0.5: R21.2 82.094,108.077 ; U?.40 80.645,91.567 82.677,93.599 82.677,107.188 81.967,107.898 81.967,107.95 82.677,108.66 82.677,109.803 81.863,110.617 75.438,110.617 73.533,112.522 32.639,112.522 29.083,108.966 29.083,104.013 33.274,99.822 39.751,99.822 41.402,98.171 41.402,76.454 45.466,72.39 88.265,72.39 94.107,78.232 108.331,78.232 110.109,80.01 113.792,80.01 R36.2
NetR22_1: R22.1 R27.2 U?.9 | length 137.2
  Bottom Layer w0.5: R27.2 54.356,82.042 69.85,82.042 74.041,86.233 87.503,86.233 89.916,88.646 ; U?.9 93.054,111.887 92.328,111.161 89.916,108.749 89.916,88.646 ; R22.1 131.318,118.618 113.411,118.618 108.839,114.046 108.839,91.186 103.989,86.336 92.226,86.336 89.916,88.646
NetR23_1: R23.1 R28.2 U?.38 | length 150.7
  Bottom Layer w0.5: U?.38 75.692,96.647 74.295,95.25 74.295,90.551 69.85,86.106 54.356,86.106 R28.2 49.657,81.407 49.657,79.629 51.07,78.216 82.534,78.216 89.662,85.344 104.394,85.344 109.601,90.551 109.601,110.744 113.538,114.681 131.318,114.681 R23.1
NetR24_1: R24.1 R29.2 U?.37 | length 153.4
  Bottom Layer w0.5: U?.37 74.803,99.187 73.279,97.663 73.279,93.599 70.612,90.932 54.864,90.932 R29.2 52.07,88.392 48.26,84.582 48.26,79.121 50.038,77.343 83.439,77.343 90.551,84.455 104.902,84.455 110.363,89.916 110.363,106.934 113.538,110.109 131.064,110.109 R24.1
NetR24_2: R24.2 YELLOW2.1 | length 3.3
  Bottom Layer w0.5: YELLOW2.1 R24.2
NetR25_1: R25.1 R30.2 U?.36 | length 166.5
  Bottom Layer w0.5: U?.36 77.608,101.97 76.697,101.97 76.686,101.981 49.403,101.981 46.99,99.568 46.99,95.631 49.403,93.218 R30.2 46.99,88.011 46.99,78.613 49.022,76.581 84.455,76.581 91.44,83.566 105.41,83.566 111.252,89.408 111.252,102.87 113.538,105.156 130.683,105.156 R25.1
NetR25_2: R25.2 RED2.1 | length 3.3
  Bottom Layer w0.5: RED2.1 R25.2
NetR26_1: R26.1 R31.2 U?.8 | length 156.6
  Bottom Layer w0.5: R31.2 54.864,100.457 79.756,100.457 80.518,99.695 80.518,96.266 79.629,95.377 76.708,95.377 75.438,94.107 75.438,88.773 76.835,87.376 86.868,87.376 88.773,89.281 88.773,109.982 91.948,113.157 94.107,113.157 94.742,112.522 ; U?.8 93.345,109.347 94.742,110.744 94.742,112.522 ; R26.1 133.604,102.87 135.763,105.029 135.763,120.015 132.969,122.809 113.411,122.809 103.759,113.157 95.377,113.157 94.742,112.522
NetR29_1: R29.1 YELLOW3.1 | length 3
  Bottom Layer w0.5: R29.1 YELLOW3.1
NetR30_1: R30.1 RED3.1 | length 3.2
  Bottom Layer w0.5: R30.1 RED3.1
NetR34_1: R34.1 YELLOW4.1 | length 2.4
  Bottom Layer w0.5: R34.1 YELLOW4.1
NetR35_1: R35.1 RED4.1 | length 2.4
  Bottom Layer w0.5: R35.1 RED4.1
NetR37_2: R37.2 SW1.2 U?.15 | length 311.8
  Top Layer w0.5: SW1.2 72.136,41.656 72.136,33.02 70.485,31.369 16.383,31.369 11.43,36.322 11.43,152.146 18.161,158.877 56.134,158.877 62.23,152.781 62.23,130.81 67.183,125.857 91.44,125.857 92.71,127.127 U?.15
  Bottom Layer w0.5: SW1.2 77.47,41.656 R37.2
NetR38_2: R38.2 SW2.2 U?.16 | length 271.7
  Top Layer w0.5: U?.16 97.282,129.667 100.076,132.461 100.076,155.702 105.537,161.163 157.734,161.163 167.005,151.892 167.005,60.96 159.639,53.594 108.204,53.594 SW2.2
  Bottom Layer w0.5: SW2.2 105.537,45.847 R38.2
NetR39_2: R39.2 SW3.2 U?.18 | length 288.6
  Top Layer w0.5: U?.18 96.139,134.747 97.917,136.525 97.917,156.972 104.267,163.322 159.258,163.322 169.164,153.416 169.164,59.817 161.036,51.689 111.125,51.689 102.87,43.434 SW3.2
  Bottom Layer w0.5: SW3.2 105.41,29.845 R39.2
NetR40_2: R40.2 SW4.2 U?.17 | length 303.7
  Top Layer w0.5: U?.17 96.52,132.207 99.06,134.747 99.06,156.464 104.775,162.179 158.75,162.179 168.148,152.781 168.148,60.452 160.274,52.578 110.109,52.578 101.092,43.561 101.092,19.812 SW4.2
  Bottom Layer w0.5: SW4.2 105.283,15.621 R40.2
NetR41_2: R41.2 SW5.2 U?.25 | length 305.7
  Top Layer w0.5: U?.25 68.707,129.667 64.897,133.477 64.897,159.766 70.231,165.1 161.036,165.1 171.196,154.94 171.196,58.547 162.56,49.911 128.27,49.911 SW5.2
  Bottom Layer w0.5: SW5.2 128.905,45.974 R41.2
NetR42_2: R42.2 SW6.2 U?.23 | length 313.6
  Top Layer w0.5: U?.23 69.977,134.747 65.913,138.811 65.913,158.877 71.247,164.211 160.02,164.211 170.18,154.051 170.18,59.182 161.798,50.8 126.619,50.8 124.206,48.387 124.206,34.798 SW6.2
  Bottom Layer w0.5: SW6.2 129.159,29.845 R42.2
NetR43_2: R43.2 R44.2 SW7.2 SW8.2 U?.26 | length 308.3
  Top Layer w0.5: U?.26 68.707,127.127 63.627,132.207 63.627,160.274 69.596,166.243 161.798,166.243 172.212,155.829 172.212,57.785 162.687,48.26 SW7.2
  Bottom Layer w0.5: SW7.2 153.289,45.593 R43.2 153.289,35.179 SW8.2 153.035,30.099 R44.2
NetU?_24: U?.24
pads on no net: U?.1 U?.10 U?.32

## Silkscreen, mask and mechanical layers (free items; w line width, h text height)
Top Overlay:
  text "RST" at 46.228,51.598 h3
  text "MODE" at 68.707,51.598 h3
  text "R14 - G23" at 82.804,49.439 h3
  text "Right23" at 110.109,47.302 h3
  text "Left23" at 135.636,47.28 h3
  text "G14 - R23" at 82.804,36.993 h3
  text "Left14" at 135.89,34.575 h3
  text "Right14" at 109.982,34.348 h3
  text "GND" at 29.845,28.23 h3
  text "5V DC" at 19.05,28.103 h3
  text "ALL RED" at 82.804,21.844 h3
  text "LucPac" at 15.621,13.158 h20